# Altium PCB Pod_Islands_Panel.PcbDoc (part 7 of 10)
Units mm, origin at the board's own origin, x right, y up, seen from the top; angles counter-clockwise.
Board outline 95.7 x 83.7 mm, 6 copper layers (Top Layer, Inner1, Inner2, Inner3, Inner4, Bottom Layer), stack 0.82 mm thick; 1100 components, 940 nets, 4944 pads, 3680 vias.
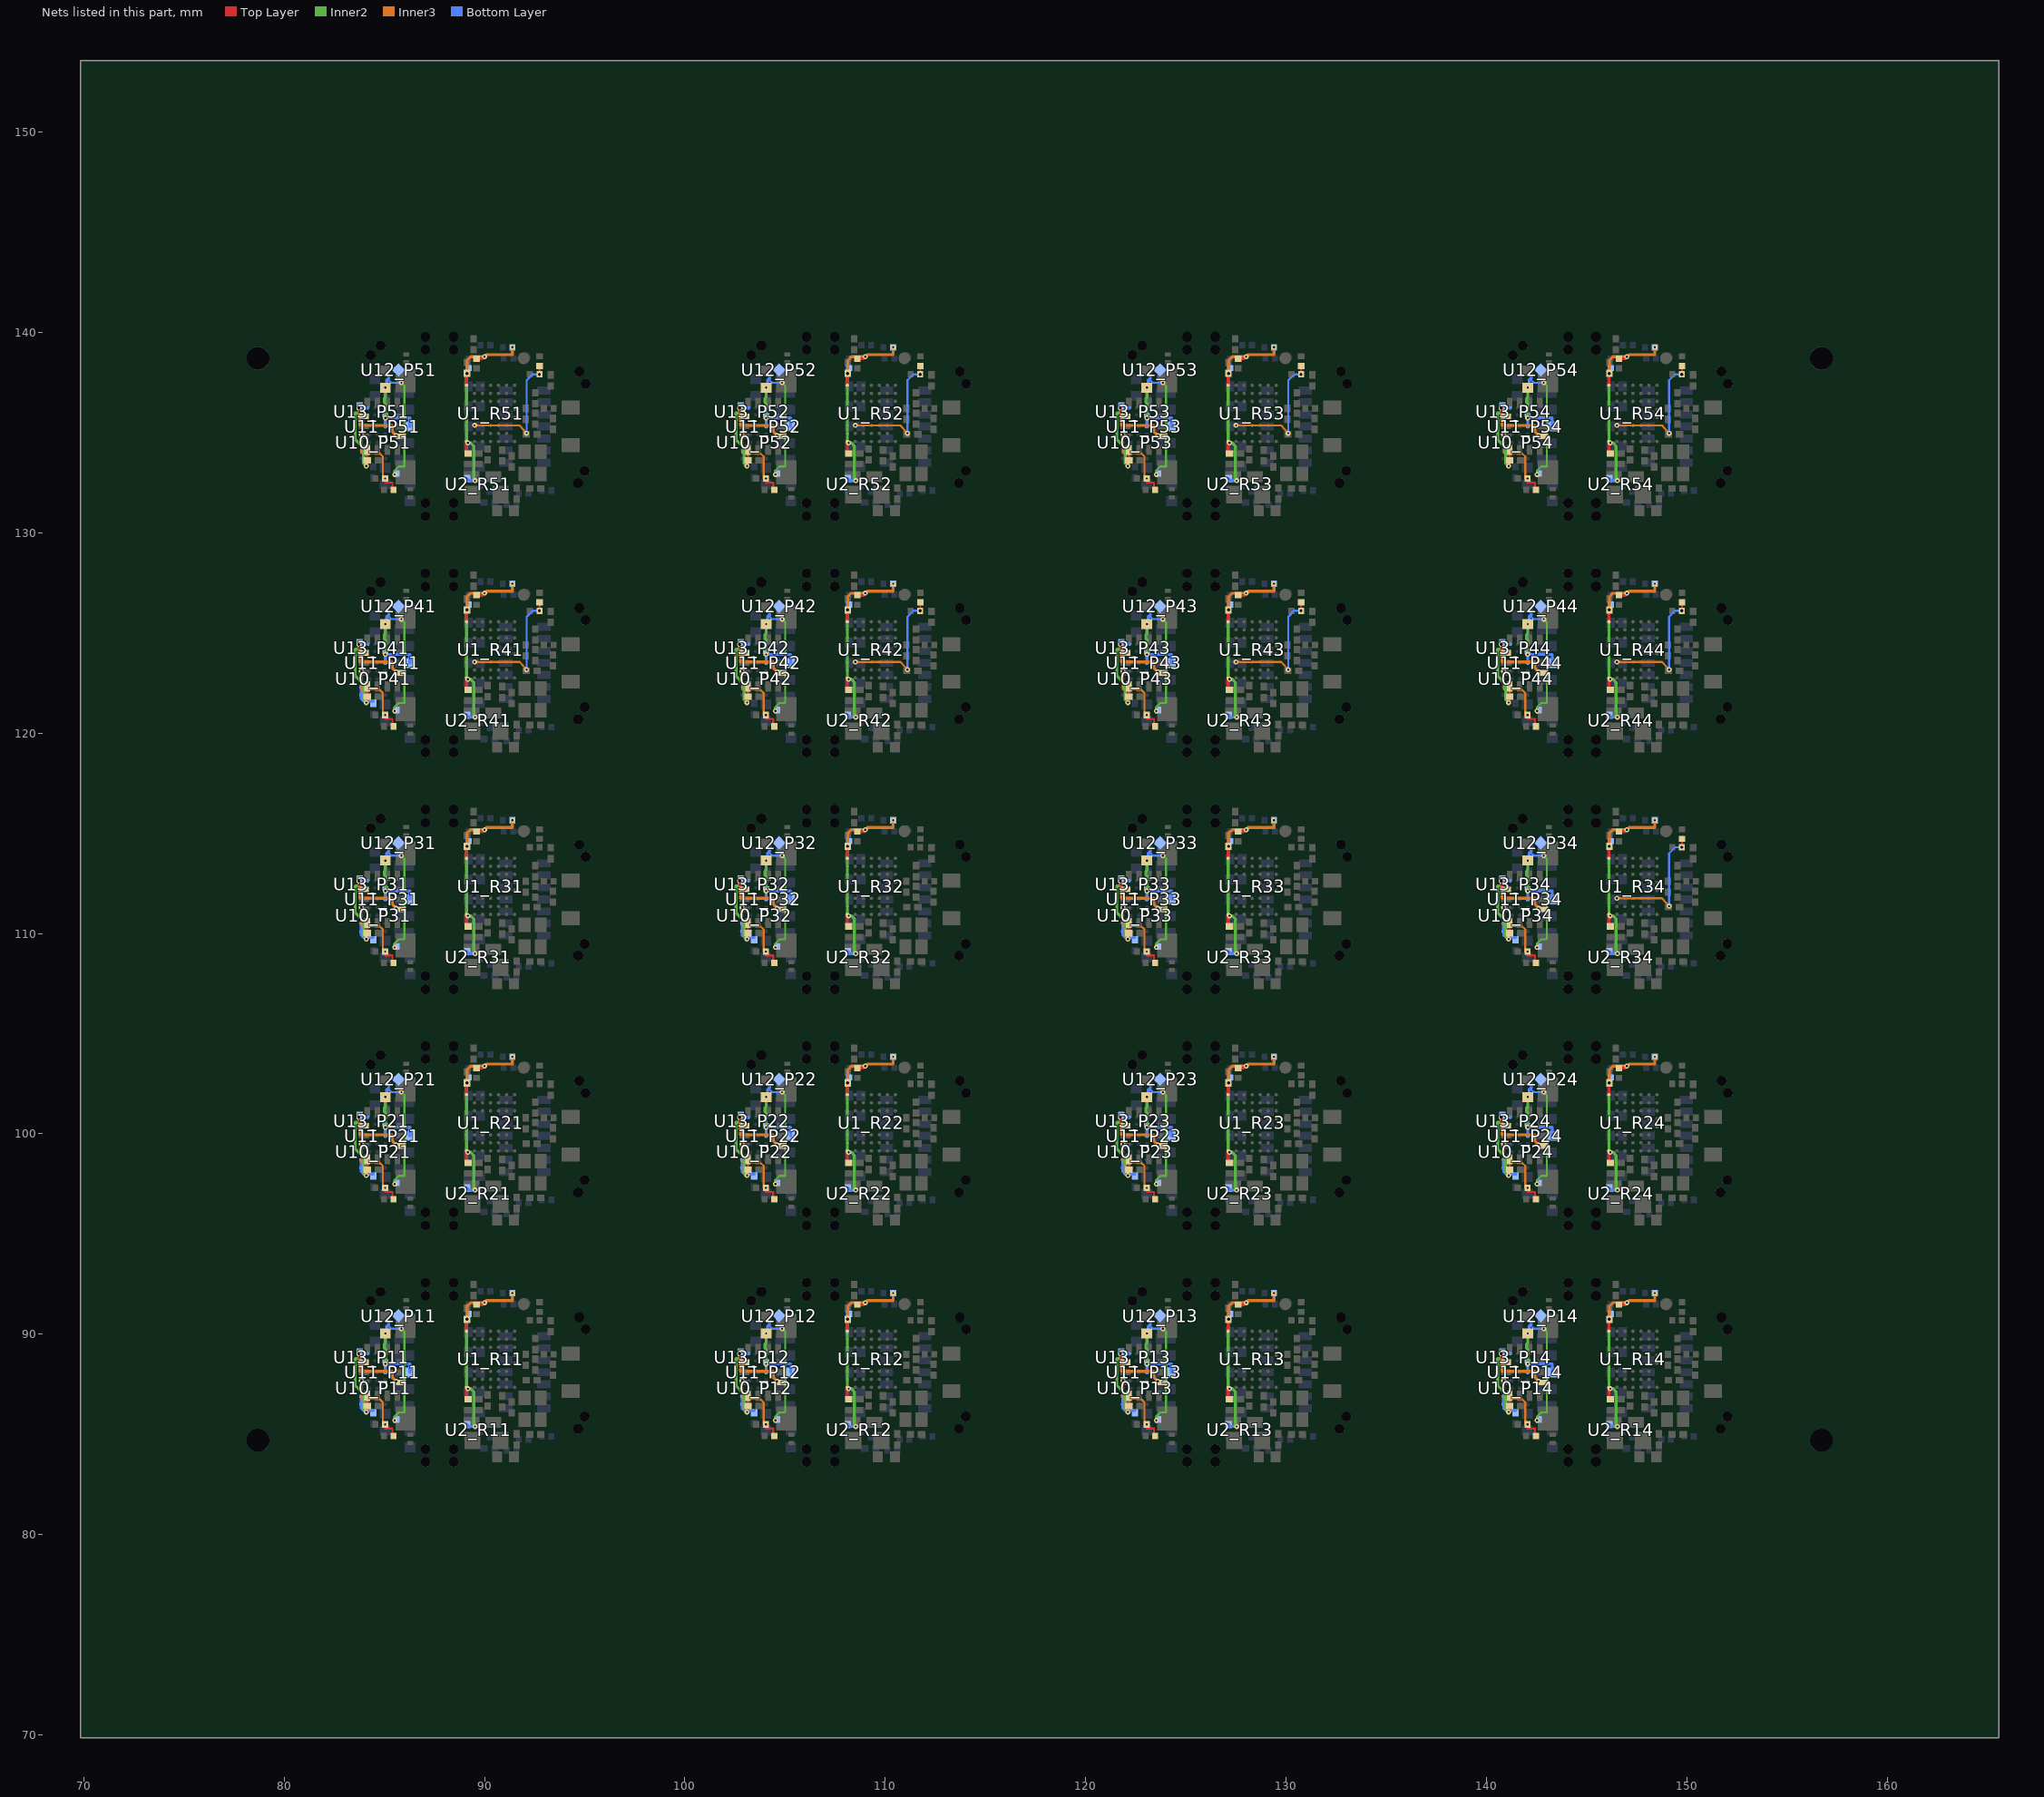
[diagram p11: the nets of this part, all layers, seen from the top]

## Via types
v1: diameter 0.249, hole 0.102, Top Layer to Inner1, 920 vias
v2: diameter 0.249, hole 0.102, Inner1 to Bottom Layer, 740 vias
v3: diameter 0.249, hole 0.102, Top Layer to Inner4, 580 vias
v4: diameter 0.249, hole 0.152, Top Layer to Bottom Layer, 540 vias
v5: diameter 0.249, hole 0.102, Inner4 to Bottom Layer, 520 vias
v6: diameter 0.3, hole 0.152, Inner1 to Inner4, 380 vias

## Nets (pads, with @x,y where several pads share a name; then routed paths per layer and width w, separated by ;. In a path a pad name is that pad's centre, name@x,y a point inside that pad or via, vN(x,y) a via of type N, cw(c..) or ccw(c..) an arc to the next point about the centre after c; other vN are vias at no path point) (continued)
TH4_SENSE_R34: R11_R34.2 TH4_R34.1 U1_R34.C6 | length 6.6
  Top Layer w0.1: v4(149.735,114.3) 149.751,114.31 TH4_R34.1@149.75,114.718
  Inner3 w0.1: v3(146.5,111.75) 148.75,111.75 v2(149.1,111.36)
  Bottom Layer w0.1: v2(149.1,111.36) 149.1,114 149.4,114.3 v4(149.735,114.3)
TH4_SENSE_R41: R11_R41.2 TH4_R41.1 U1_R41.C6 | length 6.6
  Top Layer w0.1: v4(92.735,126.1) 92.751,126.11 TH4_R41.1@92.751,126.519
  Inner3 w0.1: v3(89.5,123.55) 91.75,123.55 v2(92.1,123.16)
  Bottom Layer w0.1: v2(92.1,123.16) 92.1,125.8 92.4,126.1 v4(92.735,126.1)
TH4_SENSE_R42: R11_R42.2 TH4_R42.1 U1_R42.C6 | length 6.6
  Top Layer w0.1: v4(111.735,126.1) 111.751,126.11 TH4_R42.1@111.751,126.519
  Inner3 w0.1: v3(108.5,123.55) 110.75,123.55 v2(111.1,123.16)
  Bottom Layer w0.1: v2(111.1,123.16) 111.1,125.8 111.4,126.1 v4(111.735,126.1)
TH4_SENSE_R43: R11_R43.2 TH4_R43.1 U1_R43.C6 | length 6.6
  Top Layer w0.1: v4(130.735,126.1) 130.751,126.11 TH4_R43.1@130.751,126.519
  Inner3 w0.1: v3(127.5,123.55) 129.75,123.55 v2(130.1,123.16)
  Bottom Layer w0.1: v2(130.1,123.16) 130.1,125.8 130.4,126.1 v4(130.735,126.1)
TH4_SENSE_R44: R11_R44.2 TH4_R44.1 U1_R44.C6 | length 6.6
  Top Layer w0.1: v4(149.735,126.1) 149.751,126.11 TH4_R44.1@149.751,126.519
  Inner3 w0.1: v3(146.5,123.55) 148.75,123.55 v2(149.1,123.16)
  Bottom Layer w0.1: v2(149.1,123.16) 149.1,125.8 149.4,126.1 v4(149.735,126.1)
TH4_SENSE_R51: R11_R51.2 TH4_R51.1 U1_R51.C6 | length 6.6
  Top Layer w0.1: v4(92.735,137.9) 92.751,137.91 TH4_R51.1@92.75,138.318
  Inner3 w0.1: v3(89.5,135.35) 91.75,135.35 v2(92.1,134.96)
  Bottom Layer w0.1: v2(92.1,134.96) 92.1,137.6 92.4,137.9 v4(92.735,137.9)
TH4_SENSE_R52: R11_R52.2 TH4_R52.1 U1_R52.C6 | length 6.6
  Top Layer w0.1: v4(111.735,137.9) 111.751,137.91 TH4_R52.1@111.75,138.318
  Inner3 w0.1: v3(108.5,135.35) 110.75,135.35 v2(111.1,134.96)
  Bottom Layer w0.1: v2(111.1,134.96) 111.1,137.6 111.4,137.9 v4(111.735,137.9)
TH4_SENSE_R53: R11_R53.2 TH4_R53.1 U1_R53.C6 | length 6.6
  Top Layer w0.1: v4(130.735,137.9) 130.751,137.91 TH4_R53.1@130.751,138.319
  Inner3 w0.1: v3(127.5,135.35) 129.75,135.35 v2(130.1,134.96)
  Bottom Layer w0.1: v2(130.1,134.96) 130.1,137.6 130.4,137.9 v4(130.735,137.9)
TH4_SENSE_R54: R11_R54.2 TH4_R54.1 U1_R54.C6 | length 6.6
  Top Layer w0.1: v4(149.735,137.9) 149.751,137.91 TH4_R54.1@149.75,138.318
  Inner3 w0.1: v3(146.5,135.35) 148.75,135.35 v2(149.1,134.96)
  Bottom Layer w0.1: v2(149.1,134.96) 149.1,137.6 149.4,137.9 v4(149.735,137.9)
TS_P11: R50_P11.1 TH5_P11.1 U10_P11.B4 | length 4.2
  Top Layer w0.1: v3(85.041,85.501) 85.041,85.3 85.4,85.3 R50_P11.1@85.4,84.929
  Inner3 w0.1: v2(83.85,87.7) 83.85,86.775 84.75,86.775 84.925,86.6 84.925,85.5 v3(85.041,85.501)
TS_P12: R50_P12.1 TH5_P12.1 U10_P12.B4 | length 4.2
  Top Layer w0.1: v3(104.041,85.501) 104.041,85.3 104.4,85.3 R50_P12.1@104.4,84.929
  Inner3 w0.1: v2(102.85,87.7) 102.85,86.775 103.75,86.775 103.925,86.6 103.925,85.5 v3(104.041,85.501)
TS_P13: R50_P13.1 TH5_P13.1 U10_P13.B4 | length 4.2
  Top Layer w0.1: v3(123.041,85.501) 123.041,85.3 123.4,85.3 R50_P13.1@123.4,84.929
  Inner3 w0.1: v2(121.85,87.7) 121.85,86.775 122.75,86.775 122.925,86.6 122.925,85.5 v3(123.041,85.501)
TS_P14: R50_P14.1 TH5_P14.1 U10_P14.B4 | length 4.2
  Top Layer w0.1: v3(142.041,85.501) 142.041,85.3 142.4,85.3 R50_P14.1@142.4,84.929
  Inner3 w0.1: v2(140.85,87.7) 140.85,86.775 141.75,86.775 141.925,86.6 141.925,85.5 v3(142.041,85.501)
TS_P21: R50_P21.1 TH5_P21.1 U10_P21.B4 | length 4.2
  Top Layer w0.1: v3(85.041,97.301) 85.041,97.1 85.4,97.1 R50_P21.1@85.4,96.729
  Inner3 w0.1: v2(83.85,99.5) 83.85,98.575 84.75,98.575 84.925,98.4 84.925,97.3 v3(85.041,97.301)
TS_P22: R50_P22.1 TH5_P22.1 U10_P22.B4 | length 4.2
  Top Layer w0.1: v3(104.041,97.301) 104.041,97.1 104.4,97.1 R50_P22.1@104.4,96.729
  Inner3 w0.1: v2(102.85,99.5) 102.85,98.575 103.75,98.575 103.925,98.4 103.925,97.3 v3(104.041,97.301)
TS_P23: R50_P23.1 TH5_P23.1 U10_P23.B4 | length 4.2
  Top Layer w0.1: v3(123.041,97.301) 123.041,97.1 123.4,97.1 R50_P23.1@123.4,96.729
  Inner3 w0.1: v2(121.85,99.5) 121.85,98.575 122.75,98.575 122.925,98.4 122.925,97.3 v3(123.041,97.301)
TS_P24: R50_P24.1 TH5_P24.1 U10_P24.B4 | length 4.2
  Top Layer w0.1: v3(142.041,97.301) 142.041,97.1 142.4,97.1 R50_P24.1@142.4,96.729
  Inner3 w0.1: v2(140.85,99.5) 140.85,98.575 141.75,98.575 141.925,98.4 141.925,97.3 v3(142.041,97.301)
TS_P31: R50_P31.1 TH5_P31.1 U10_P31.B4 | length 4.2
  Top Layer w0.1: v3(85.041,109.101) 85.041,108.9 85.4,108.9 R50_P31.1@85.4,108.529
  Inner3 w0.1: v2(83.85,111.3) 83.85,110.375 84.75,110.375 84.925,110.2 84.925,109.1 v3(85.041,109.101)
TS_P32: R50_P32.1 TH5_P32.1 U10_P32.B4 | length 4.2
  Top Layer w0.1: v3(104.041,109.101) 104.041,108.9 104.4,108.9 R50_P32.1@104.4,108.529
  Inner3 w0.1: v2(102.85,111.3) 102.85,110.375 103.75,110.375 103.925,110.2 103.925,109.1 v3(104.041,109.101)
TS_P33: R50_P33.1 TH5_P33.1 U10_P33.B4 | length 4.2
  Top Layer w0.1: v3(123.041,109.101) 123.041,108.9 123.4,108.9 R50_P33.1@123.4,108.529
  Inner3 w0.1: v2(121.85,111.3) 121.85,110.375 122.75,110.375 122.925,110.2 122.925,109.1 v3(123.041,109.101)
TS_P34: R50_P34.1 TH5_P34.1 U10_P34.B4 | length 4.2
  Top Layer w0.1: v3(142.041,109.101) 142.041,108.9 142.4,108.9 R50_P34.1@142.4,108.529
  Inner3 w0.1: v2(140.85,111.3) 140.85,110.375 141.75,110.375 141.925,110.2 141.925,109.1 v3(142.041,109.101)
TS_P41: R50_P41.1 TH5_P41.1 U10_P41.B4 | length 4.2
  Top Layer w0.1: v3(85.041,120.901) 85.041,120.7 85.4,120.7 R50_P41.1@85.4,120.329
  Inner3 w0.1: v2(83.85,123.1) 83.85,122.175 84.75,122.175 84.925,122 84.925,120.9 v3(85.041,120.901)
TS_P42: R50_P42.1 TH5_P42.1 U10_P42.B4 | length 4.2
  Top Layer w0.1: v3(104.041,120.901) 104.041,120.7 104.4,120.7 R50_P42.1@104.4,120.329
  Inner3 w0.1: v2(102.85,123.1) 102.85,122.175 103.75,122.175 103.925,122 103.925,120.9 v3(104.041,120.901)
TS_P43: R50_P43.1 TH5_P43.1 U10_P43.B4 | length 4.2
  Top Layer w0.1: v3(123.041,120.901) 123.041,120.7 123.4,120.7 R50_P43.1@123.4,120.329
  Inner3 w0.1: v2(121.85,123.1) 121.85,122.175 122.75,122.175 122.925,122 122.925,120.9 v3(123.041,120.901)
TS_P44: R50_P44.1 TH5_P44.1 U10_P44.B4 | length 4.2
  Top Layer w0.1: v3(142.041,120.901) 142.041,120.7 142.4,120.7 R50_P44.1@142.4,120.329
  Inner3 w0.1: v2(140.85,123.1) 140.85,122.175 141.75,122.175 141.925,122 141.925,120.9 v3(142.041,120.901)
TS_P51: R50_P51.1 TH5_P51.1 U10_P51.B4 | length 4.2
  Top Layer w0.1: v3(85.041,132.701) 85.041,132.5 85.4,132.5 R50_P51.1@85.4,132.129
  Inner3 w0.1: v2(83.85,134.9) 83.85,133.975 84.75,133.975 84.925,133.8 84.925,132.7 v3(85.041,132.701)
TS_P52: R50_P52.1 TH5_P52.1 U10_P52.B4 | length 4.2
  Top Layer w0.1: v3(104.041,132.701) 104.041,132.5 104.4,132.5 R50_P52.1@104.4,132.129
  Inner3 w0.1: v2(102.85,134.9) 102.85,133.975 103.75,133.975 103.925,133.8 103.925,132.7 v3(104.041,132.701)
TS_P53: R50_P53.1 TH5_P53.1 U10_P53.B4 | length 4.2
  Top Layer w0.1: v3(123.041,132.701) 123.041,132.5 123.4,132.5 R50_P53.1@123.4,132.129
  Inner3 w0.1: v2(121.85,134.9) 121.85,133.975 122.75,133.975 122.925,133.8 122.925,132.7 v3(123.041,132.701)
TS_P54: R50_P54.1 TH5_P54.1 U10_P54.B4 | length 4.2
  Top Layer w0.1: v3(142.041,132.701) 142.041,132.5 142.4,132.5 R50_P54.1@142.4,132.129
  Inner3 w0.1: v2(140.85,134.9) 140.85,133.975 141.75,133.975 141.925,133.8 141.925,132.7 v3(142.041,132.701)
U12_EP_P11: U12_P11.5
U12_EP_P12: U12_P12.5
U12_EP_P13: U12_P13.5
U12_EP_P14: U12_P14.5
U12_EP_P21: U12_P21.5
U12_EP_P22: U12_P22.5
U12_EP_P23: U12_P23.5
U12_EP_P24: U12_P24.5
U12_EP_P31: U12_P31.5
U12_EP_P32: U12_P32.5
U12_EP_P33: U12_P33.5
U12_EP_P34: U12_P34.5
U12_EP_P41: U12_P41.5
U12_EP_P42: U12_P42.5
U12_EP_P43: U12_P43.5
U12_EP_P44: U12_P44.5
U12_EP_P51: U12_P51.5
U12_EP_P52: U12_P52.5
U12_EP_P53: U12_P53.5
U12_EP_P54: U12_P54.5
U12_VDD_P11: C55_P11.1 R51_P11.2 U12_P11.1 | length 6.5
  Inner2 w0.1: v2(85.52,85.7) 85.52,85.9 85.72,86.1 86,86.1 86,90.13 v2(85.85,90.28)
  Bottom Layer w0.1: 85.224,90.504 85.224,90.406 85.35,90.28 v2(85.85,90.28) ; v2(85.52,85.7) 85.558,85.7 R51_P11.2@85.608,85.75
  Bottom Layer w0.15: C55_P11.1@85.12,90.039 85.12,90.4 85.224,90.504 U12_P11.1@85.224,90.596
U12_VDD_P12: C55_P12.1 R51_P12.2 U12_P12.1 | length 6.5
  Inner2 w0.1: v2(104.52,85.7) 104.52,85.9 104.72,86.1 105,86.1 105,90.13 v2(104.85,90.28)
  Bottom Layer w0.1: 104.224,90.504 104.224,90.406 104.35,90.28 v2(104.85,90.28) ; v2(104.52,85.7) 104.558,85.7 R51_P12.2@104.608,85.75
  Bottom Layer w0.15: C55_P12.1@104.12,90.039 104.12,90.4 104.224,90.504 U12_P12.1@104.224,90.596
U12_VDD_P13: C55_P13.1 R51_P13.2 U12_P13.1 | length 6.5
  Inner2 w0.1: v2(123.52,85.7) 123.52,85.9 123.72,86.1 124,86.1 124,90.13 v2(123.85,90.28)
  Bottom Layer w0.1: 123.224,90.504 123.224,90.406 123.35,90.28 v2(123.85,90.28) ; v2(123.52,85.7) 123.558,85.7 R51_P13.2@123.607,85.75
  Bottom Layer w0.15: C55_P13.1@123.12,90.039 123.12,90.4 123.224,90.504 U12_P13.1@123.224,90.596
U12_VDD_P14: C55_P14.1 R51_P14.2 U12_P14.1 | length 6.5
  Inner2 w0.1: v2(142.52,85.7) 142.52,85.9 142.72,86.1 143,86.1 143,90.13 v2(142.85,90.28)
  Bottom Layer w0.1: 142.224,90.504 142.224,90.406 142.35,90.28 v2(142.85,90.28) ; v2(142.52,85.7) 142.558,85.7 R51_P14.2@142.608,85.75
  Bottom Layer w0.15: C55_P14.1@142.12,90.039 142.12,90.4 142.224,90.504 U12_P14.1@142.224,90.596
U12_VDD_P21: C55_P21.1 R51_P21.2 U12_P21.1 | length 6.5
  Inner2 w0.1: v2(85.52,97.5) 85.52,97.7 85.72,97.9 86,97.9 86,101.93 v2(85.85,102.08)
  Bottom Layer w0.1: 85.224,102.304 85.224,102.206 85.35,102.08 v2(85.85,102.08) ; v2(85.52,97.5) 85.558,97.5 R51_P21.2@85.607,97.55
  Bottom Layer w0.15: C55_P21.1@85.12,101.839 85.12,102.2 85.224,102.304 U12_P21.1@85.224,102.396
U12_VDD_P22: C55_P22.1 R51_P22.2 U12_P22.1 | length 6.5
  Inner2 w0.1: v2(104.52,97.5) 104.52,97.7 104.72,97.9 105,97.9 105,101.93 v2(104.85,102.08)
  Bottom Layer w0.1: 104.224,102.304 104.224,102.206 104.35,102.08 v2(104.85,102.08) ; v2(104.52,97.5) 104.558,97.5 R51_P22.2@104.607,97.55
  Bottom Layer w0.15: C55_P22.1@104.12,101.839 104.12,102.2 104.224,102.304 U12_P22.1@104.224,102.396
U12_VDD_P23: C55_P23.1 R51_P23.2 U12_P23.1 | length 6.5
  Inner2 w0.1: v2(123.52,97.5) 123.52,97.7 123.72,97.9 124,97.9 124,101.93 v2(123.85,102.08)
  Bottom Layer w0.1: 123.224,102.304 123.224,102.206 123.35,102.08 v2(123.85,102.08) ; v2(123.52,97.5) 123.558,97.5 R51_P23.2@123.607,97.55
  Bottom Layer w0.15: C55_P23.1@123.12,101.839 123.12,102.2 123.224,102.304 U12_P23.1@123.224,102.396
U12_VDD_P24: C55_P24.1 R51_P24.2 U12_P24.1 | length 6.5
  Inner2 w0.1: v2(142.52,97.5) 142.52,97.7 142.72,97.9 143,97.9 143,101.93 v2(142.85,102.08)
  Bottom Layer w0.1: 142.224,102.304 142.224,102.206 142.35,102.08 v2(142.85,102.08) ; v2(142.52,97.5) 142.558,97.5 R51_P24.2@142.607,97.55
  Bottom Layer w0.15: C55_P24.1@142.12,101.839 142.12,102.2 142.224,102.304 U12_P24.1@142.224,102.396
U12_VDD_P31: C55_P31.1 R51_P31.2 U12_P31.1 | length 6.5
  Inner2 w0.1: v2(85.52,109.3) 85.52,109.5 85.72,109.7 86,109.7 86,113.73 v2(85.85,113.88)
  Bottom Layer w0.1: 85.224,114.104 85.224,114.006 85.35,113.88 v2(85.85,113.88) ; v2(85.52,109.3) 85.558,109.3 R51_P31.2@85.608,109.35
  Bottom Layer w0.15: C55_P31.1@85.12,113.639 85.12,114 85.224,114.104 U12_P31.1@85.224,114.196
U12_VDD_P32: C55_P32.1 R51_P32.2 U12_P32.1 | length 6.5
  Inner2 w0.1: v2(104.52,109.3) 104.52,109.5 104.72,109.7 105,109.7 105,113.73 v2(104.85,113.88)
  Bottom Layer w0.1: 104.224,114.104 104.224,114.006 104.35,113.88 v2(104.85,113.88) ; v2(104.52,109.3) 104.558,109.3 R51_P32.2@104.608,109.35
  Bottom Layer w0.15: C55_P32.1@104.12,113.639 104.12,114 104.224,114.104 U12_P32.1@104.224,114.196
U12_VDD_P33: C55_P33.1 R51_P33.2 U12_P33.1 | length 6.5
  Inner2 w0.1: v2(123.52,109.3) 123.52,109.5 123.72,109.7 124,109.7 124,113.73 v2(123.85,113.88)
  Bottom Layer w0.1: 123.224,114.104 123.224,114.006 123.35,113.88 v2(123.85,113.88) ; v2(123.52,109.3) 123.558,109.3 R51_P33.2@123.607,109.35
  Bottom Layer w0.15: C55_P33.1@123.12,113.639 123.12,114 123.224,114.104 U12_P33.1@123.224,114.196
U12_VDD_P34: C55_P34.1 R51_P34.2 U12_P34.1 | length 6.5
  Inner2 w0.1: v2(142.52,109.3) 142.52,109.5 142.72,109.7 143,109.7 143,113.73 v2(142.85,113.88)
  Bottom Layer w0.1: 142.224,114.104 142.224,114.006 142.35,113.88 v2(142.85,113.88) ; v2(142.52,109.3) 142.558,109.3 R51_P34.2@142.608,109.35
  Bottom Layer w0.15: C55_P34.1@142.12,113.639 142.12,114 142.224,114.104 U12_P34.1@142.224,114.196
U12_VDD_P41: C55_P41.1 R51_P41.2 U12_P41.1 | length 6.5
  Inner2 w0.1: v2(85.52,121.1) 85.52,121.3 85.72,121.5 86,121.5 86,125.53 v2(85.85,125.68)
  Bottom Layer w0.1: 85.224,125.904 85.224,125.806 85.35,125.68 v2(85.85,125.68) ; v2(85.52,121.1) 85.558,121.1 R51_P41.2@85.608,121.15
  Bottom Layer w0.15: C55_P41.1@85.12,125.439 85.12,125.8 85.224,125.904 U12_P41.1@85.224,125.996
U12_VDD_P42: C55_P42.1 R51_P42.2 U12_P42.1 | length 6.5
  Inner2 w0.1: v2(104.52,121.1) 104.52,121.3 104.72,121.5 105,121.5 105,125.53 v2(104.85,125.68)
  Bottom Layer w0.1: 104.224,125.904 104.224,125.806 104.35,125.68 v2(104.85,125.68) ; v2(104.52,121.1) 104.558,121.1 R51_P42.2@104.608,121.15
  Bottom Layer w0.15: C55_P42.1@104.12,125.439 104.12,125.8 104.224,125.904 U12_P42.1@104.224,125.996
U12_VDD_P43: C55_P43.1 R51_P43.2 U12_P43.1 | length 6.5
  Inner2 w0.1: v2(123.52,121.1) 123.52,121.3 123.72,121.5 124,121.5 124,125.53 v2(123.85,125.68)
  Bottom Layer w0.1: 123.224,125.904 123.224,125.806 123.35,125.68 v2(123.85,125.68) ; v2(123.52,121.1) 123.558,121.1 R51_P43.2@123.607,121.15
  Bottom Layer w0.15: C55_P43.1@123.12,125.439 123.12,125.8 123.224,125.904 U12_P43.1@123.224,125.996
U12_VDD_P44: C55_P44.1 R51_P44.2 U12_P44.1 | length 6.5
  Inner2 w0.1: v2(142.52,121.1) 142.52,121.3 142.72,121.5 143,121.5 143,125.53 v2(142.85,125.68)
  Bottom Layer w0.1: 142.224,125.904 142.224,125.806 142.35,125.68 v2(142.85,125.68) ; v2(142.52,121.1) 142.558,121.1 R51_P44.2@142.608,121.15
  Bottom Layer w0.15: C55_P44.1@142.12,125.439 142.12,125.8 142.224,125.904 U12_P44.1@142.224,125.996
U12_VDD_P51: C55_P51.1 R51_P51.2 U12_P51.1 | length 6.5
  Inner2 w0.1: v2(85.52,132.9) 85.52,133.1 85.72,133.3 86,133.3 86,137.33 v2(85.85,137.48)
  Bottom Layer w0.1: 85.224,137.704 85.224,137.606 85.35,137.48 v2(85.85,137.48) ; v2(85.52,132.9) 85.558,132.9 R51_P51.2@85.607,132.95
  Bottom Layer w0.15: C55_P51.1@85.12,137.239 85.12,137.6 85.224,137.704 U12_P51.1@85.224,137.796
U12_VDD_P52: C55_P52.1 R51_P52.2 U12_P52.1 | length 6.5
  Inner2 w0.1: v2(104.52,132.9) 104.52,133.1 104.72,133.3 105,133.3 105,137.33 v2(104.85,137.48)
  Bottom Layer w0.1: 104.224,137.704 104.224,137.606 104.35,137.48 v2(104.85,137.48) ; v2(104.52,132.9) 104.558,132.9 R51_P52.2@104.607,132.95
  Bottom Layer w0.15: C55_P52.1@104.12,137.239 104.12,137.6 104.224,137.704 U12_P52.1@104.224,137.796
U12_VDD_P53: C55_P53.1 R51_P53.2 U12_P53.1 | length 6.5
  Inner2 w0.1: v2(123.52,132.9) 123.52,133.1 123.72,133.3 124,133.3 124,137.33 v2(123.85,137.48)
  Bottom Layer w0.1: 123.224,137.704 123.224,137.606 123.35,137.48 v2(123.85,137.48) ; v2(123.52,132.9) 123.558,132.9 R51_P53.2@123.607,132.95
  Bottom Layer w0.15: C55_P53.1@123.12,137.239 123.12,137.6 123.224,137.704 U12_P53.1@123.224,137.796
U12_VDD_P54: C55_P54.1 R51_P54.2 U12_P54.1 | length 6.5
  Inner2 w0.1: v2(142.52,132.9) 142.52,133.1 142.72,133.3 143,133.3 143,137.33 v2(142.85,137.48)
  Bottom Layer w0.1: 142.224,137.704 142.224,137.606 142.35,137.48 v2(142.85,137.48) ; v2(142.52,132.9) 142.558,132.9 R51_P54.2@142.607,132.95
  Bottom Layer w0.15: C55_P54.1@142.12,137.239 142.12,137.6 142.224,137.704 U12_P54.1@142.224,137.796
VDD_1V8_R11: C5_R11.1 C8_R11.1 C21_R11.1 R1_R11.1 R2_R11.1 R3_R11.1 U1_R11.A7 U1_R11.H7 U2_R11.A2 | length 11.2
  Top Layer w0.15: U1_R11.H7@89.1,90.15 89.094,90.718 v4(89.122,90.746) ; v3(89.17,87.281) U1_R11.A7@89.1,87.35 89.101,86.824 C8_R11.1@89.175,86.75 ; R3_R11.1@89.599,91.481 89.904,91.48 v3(90,91.576)
  Inner2 w0.15: v4(89.122,90.746) 89.101,90.718 89.101,87.35 v3(89.17,87.281) 89.31,87.281 89.46,87.131 89.46,85.459 v2(89.525,85.394)
  Inner3 w0.15: v4(89.122,90.746) 89.129,91.405 89.3,91.576 v3(90,91.576) 90.104,91.68 91.392,91.68 v2(91.392,92.049)
  Bottom Layer w0.15: C21_R11.1@89.129,85.496 89.231,85.394 v2(89.525,85.394)
VDD_1V8_R12: C5_R12.1 C8_R12.1 C21_R12.1 R1_R12.1 R2_R12.1 R3_R12.1 U1_R12.A7 U1_R12.H7 U2_R12.A2 | length 11.2
  Top Layer w0.15: U1_R12.H7@108.1,90.15 108.094,90.718 v4(108.122,90.746) ; v3(108.17,87.281) U1_R12.A7@108.1,87.35 108.101,86.824 C8_R12.1@108.175,86.75 ; R3_R12.1@108.599,91.481 108.904,91.48 v3(109,91.576)
  Inner2 w0.15: v4(108.122,90.746) 108.101,90.718 108.101,87.35 v3(108.17,87.281) 108.31,87.281 108.46,87.131 108.46,85.459 v2(108.525,85.394)
  Inner3 w0.15: v4(108.122,90.746) 108.129,91.405 108.3,91.576 v3(109,91.576) 109.104,91.68 110.392,91.68 v2(110.392,92.049)
  Bottom Layer w0.15: C21_R12.1@108.129,85.496 108.231,85.394 v2(108.525,85.394)
VDD_1V8_R13: C5_R13.1 C8_R13.1 C21_R13.1 R1_R13.1 R2_R13.1 R3_R13.1 U1_R13.A7 U1_R13.H7 U2_R13.A2 | length 11.2
  Top Layer w0.15: U1_R13.H7@127.101,90.149 127.094,90.718 v4(127.122,90.746) ; v3(127.17,87.281) 127.101,87.35 127.101,86.824 C8_R13.1@127.175,86.75 ; R3_R13.1@127.599,91.481 127.904,91.48 v3(128,91.576)
  Inner2 w0.15: v4(127.122,90.746) 127.101,90.718 127.101,87.35 v3(127.17,87.281) 127.31,87.281 127.46,87.131 127.46,85.459 v2(127.525,85.394)
  Inner3 w0.15: v4(127.122,90.746) 127.129,91.405 127.3,91.576 v3(128,91.576) 128.104,91.68 129.392,91.68 v2(129.392,92.049)
  Bottom Layer w0.15: C21_R13.1@127.129,85.496 127.231,85.394 v2(127.525,85.394)
VDD_1V8_R14: C5_R14.1 C8_R14.1 C21_R14.1 R1_R14.1 R2_R14.1 R3_R14.1 U1_R14.A7 U1_R14.H7 U2_R14.A2 | length 11.2
  Top Layer w0.15: U1_R14.H7@146.1,90.15 146.094,90.718 v4(146.122,90.746) ; v3(146.17,87.281) U1_R14.A7@146.1,87.35 146.101,86.824 C8_R14.1@146.175,86.75 ; R3_R14.1@146.599,91.481 146.904,91.48 v3(147,91.576)
  Inner2 w0.15: v4(146.122,90.746) 146.101,90.718 146.101,87.35 v3(146.17,87.281) 146.31,87.281 146.46,87.131 146.46,85.459 v2(146.525,85.394)
  Inner3 w0.15: v4(146.122,90.746) 146.129,91.405 146.3,91.576 v3(147,91.576) 147.104,91.68 148.392,91.68 v2(148.392,92.049)
  Bottom Layer w0.15: C21_R14.1@146.129,85.496 146.231,85.394 v2(146.525,85.394)
VDD_1V8_R21: C5_R21.1 C8_R21.1 C21_R21.1 R1_R21.1 R2_R21.1 R3_R21.1 U1_R21.A7 U1_R21.H7 U2_R21.A2 | length 11.2
  Top Layer w0.15: U1_R21.H7@89.101,101.949 89.094,102.518 v4(89.122,102.546) ; v3(89.17,99.081) U1_R21.A7@89.1,99.15 89.101,98.624 C8_R21.1@89.175,98.55 ; R3_R21.1@89.599,103.28 89.904,103.28 v3(90,103.376)
  Inner2 w0.15: v4(89.122,102.546) 89.101,102.518 89.101,99.15 v3(89.17,99.081) 89.31,99.081 89.46,98.931 89.46,97.259 v2(89.525,97.194)
  Inner3 w0.15: v4(89.122,102.546) 89.129,103.205 89.3,103.376 v3(90,103.376) 90.104,103.48 91.392,103.48 v2(91.392,103.849)
  Bottom Layer w0.15: C21_R21.1@89.129,97.296 89.231,97.194 v2(89.525,97.194)
VDD_1V8_R22: C5_R22.1 C8_R22.1 C21_R22.1 R1_R22.1 R2_R22.1 R3_R22.1 U1_R22.A7 U1_R22.H7 U2_R22.A2 | length 11.2
  Top Layer w0.15: U1_R22.H7@108.101,101.949 108.094,102.518 v4(108.122,102.546) ; v3(108.17,99.081) U1_R22.A7@108.1,99.15 108.101,98.624 C8_R22.1@108.175,98.55 ; R3_R22.1@108.599,103.28 108.904,103.28 v3(109,103.376)
  Inner2 w0.15: v4(108.122,102.546) 108.101,102.518 108.101,99.15 v3(108.17,99.081) 108.31,99.081 108.46,98.931 108.46,97.259 v2(108.525,97.194)
  Inner3 w0.15: v4(108.122,102.546) 108.129,103.205 108.3,103.376 v3(109,103.376) 109.104,103.48 110.392,103.48 v2(110.392,103.849)
  Bottom Layer w0.15: C21_R22.1@108.13,97.294 108.231,97.194 v2(108.525,97.194)
VDD_1V8_R23: C5_R23.1 C8_R23.1 C21_R23.1 R1_R23.1 R2_R23.1 R3_R23.1 U1_R23.A7 U1_R23.H7 U2_R23.A2 | length 11.2
  Top Layer w0.15: U1_R23.H7@127.101,101.949 127.094,102.518 v4(127.122,102.546) ; v3(127.17,99.081) 127.101,99.15 127.101,98.624 C8_R23.1@127.175,98.55 ; R3_R23.1@127.599,103.28 127.904,103.28 v3(128,103.376)
  Inner2 w0.15: v4(127.122,102.546) 127.101,102.518 127.101,99.15 v3(127.17,99.081) 127.31,99.081 127.46,98.931 127.46,97.259 v2(127.525,97.194)
  Inner3 w0.15: v4(127.122,102.546) 127.129,103.205 127.3,103.376 v3(128,103.376) 128.104,103.48 129.392,103.48 v2(129.392,103.849)
  Bottom Layer w0.15: C21_R23.1@127.13,97.294 127.231,97.194 v2(127.525,97.194)
VDD_1V8_R24: C5_R24.1 C8_R24.1 C21_R24.1 R1_R24.1 R2_R24.1 R3_R24.1 U1_R24.A7 U1_R24.H7 U2_R24.A2 | length 11.2
  Top Layer w0.15: U1_R24.H7@146.101,101.949 146.094,102.518 v4(146.122,102.546) ; v3(146.17,99.081) U1_R24.A7@146.1,99.15 146.101,98.624 C8_R24.1@146.175,98.55 ; R3_R24.1@146.599,103.28 146.904,103.28 v3(147,103.376)
  Inner2 w0.15: v4(146.122,102.546) 146.101,102.518 146.101,99.15 v3(146.17,99.081) 146.31,99.081 146.46,98.931 146.46,97.259 v2(146.525,97.194)
  Inner3 w0.15: v4(146.122,102.546) 146.129,103.205 146.3,103.376 v3(147,103.376) 147.104,103.48 148.392,103.48 v2(148.392,103.849)
  Bottom Layer w0.15: C21_R24.1@146.129,97.296 146.231,97.194 v2(146.525,97.194)
VDD_1V8_R31: C5_R31.1 C8_R31.1 C21_R31.1 R1_R31.1 R2_R31.1 R3_R31.1 U1_R31.A7 U1_R31.H7 U2_R31.A2 | length 11.2
  Top Layer w0.15: U1_R31.H7@89.1,113.75 89.094,114.318 v4(89.122,114.346) ; v3(89.17,110.881) U1_R31.A7@89.1,110.95 89.101,110.424 C8_R31.1@89.175,110.35 ; R3_R31.1@89.599,115.08 89.904,115.08 v3(90,115.176)
  Inner2 w0.15: v4(89.122,114.346) 89.101,114.318 89.101,110.95 v3(89.17,110.881) 89.31,110.881 89.46,110.731 89.46,109.059 v2(89.525,108.994)
  Inner3 w0.15: v4(89.122,114.346) 89.129,115.005 89.3,115.176 v3(90,115.176) 90.104,115.28 91.392,115.28 v2(91.392,115.649)
  Bottom Layer w0.15: C21_R31.1@89.129,109.096 89.231,108.994 v2(89.525,108.994)
VDD_1V8_R32: C5_R32.1 C8_R32.1 C21_R32.1 R1_R32.1 R2_R32.1 R3_R32.1 U1_R32.A7 U1_R32.H7 U2_R32.A2 | length 11.2
  Top Layer w0.15: U1_R32.H7@108.1,113.75 108.094,114.318 v4(108.122,114.346) ; v3(108.17,110.881) U1_R32.A7@108.1,110.95 108.101,110.424 C8_R32.1@108.175,110.35 ; R3_R32.1@108.599,115.08 108.904,115.08 v3(109,115.176)
  Inner2 w0.15: v4(108.122,114.346) 108.101,114.318 108.101,110.95 v3(108.17,110.881) 108.31,110.881 108.46,110.731 108.46,109.059 v2(108.525,108.994)
  Inner3 w0.15: v4(108.122,114.346) 108.129,115.005 108.3,115.176 v3(109,115.176) 109.104,115.28 110.392,115.28 v2(110.392,115.649)
  Bottom Layer w0.15: C21_R32.1@108.13,109.094 108.231,108.994 v2(108.525,108.994)
VDD_1V8_R33: C5_R33.1 C8_R33.1 C21_R33.1 R1_R33.1 R2_R33.1 R3_R33.1 U1_R33.A7 U1_R33.H7 U2_R33.A2 | length 11.2
  Top Layer w0.15: U1_R33.H7@127.101,113.749 127.094,114.318 v4(127.122,114.346) ; v3(127.17,110.881) 127.101,110.95 127.101,110.424 C8_R33.1@127.175,110.35 ; R3_R33.1@127.599,115.08 127.904,115.08 v3(128,115.176)
  Inner2 w0.15: v4(127.122,114.346) 127.101,114.318 127.101,110.95 v3(127.17,110.881) 127.31,110.881 127.46,110.731 127.46,109.059 v2(127.525,108.994)
  Inner3 w0.15: v4(127.122,114.346) 127.129,115.005 127.3,115.176 v3(128,115.176) 128.104,115.28 129.392,115.28 v2(129.392,115.649)
  Bottom Layer w0.15: C21_R33.1@127.13,109.094 127.231,108.994 v2(127.525,108.994)
VDD_1V8_R34: C5_R34.1 C8_R34.1 C21_R34.1 R1_R34.1 R2_R34.1 R3_R34.1 U1_R34.A7 U1_R34.H7 U2_R34.A2 | length 11.2
  Top Layer w0.15: U1_R34.H7@146.1,113.75 146.094,114.318 v4(146.122,114.346) ; v3(146.17,110.881) U1_R34.A7@146.1,110.95 146.101,110.424 C8_R34.1@146.175,110.35 ; R3_R34.1@146.599,115.08 146.904,115.08 v3(147,115.176)
  Inner2 w0.15: v4(146.122,114.346) 146.101,114.318 146.101,110.95 v3(146.17,110.881) 146.31,110.881 146.46,110.731 146.46,109.059 v2(146.525,108.994)
  Inner3 w0.15: v4(146.122,114.346) 146.129,115.005 146.3,115.176 v3(147,115.176) 147.104,115.28 148.392,115.28 v2(148.392,115.649)
  Bottom Layer w0.15: C21_R34.1@146.129,109.096 146.231,108.994 v2(146.525,108.994)
VDD_1V8_R41: C5_R41.1 C8_R41.1 C21_R41.1 R1_R41.1 R2_R41.1 R3_R41.1 U1_R41.A7 U1_R41.H7 U2_R41.A2 | length 11.2
  Top Layer w0.15: U1_R41.H7@89.1,125.55 89.094,126.118 v4(89.122,126.146) ; v3(89.17,122.681) U1_R41.A7@89.1,122.75 89.101,122.224 C8_R41.1@89.175,122.15 ; R3_R41.1@89.599,126.881 89.904,126.88 v3(90,126.976)
  Inner2 w0.15: v4(89.122,126.146) 89.101,126.118 89.101,122.75 v3(89.17,122.681) 89.31,122.681 89.46,122.531 89.46,120.859 v2(89.525,120.794)
  Inner3 w0.15: v4(89.122,126.146) 89.129,126.805 89.3,126.976 v3(90,126.976) 90.104,127.08 91.392,127.08 v2(91.392,127.449)
  Bottom Layer w0.15: C21_R41.1@89.129,120.896 89.231,120.794 v2(89.525,120.794)
VDD_1V8_R42: C5_R42.1 C8_R42.1 C21_R42.1 R1_R42.1 R2_R42.1 R3_R42.1 U1_R42.A7 U1_R42.H7 U2_R42.A2 | length 11.2
  Top Layer w0.15: U1_R42.H7@108.1,125.55 108.094,126.118 v4(108.122,126.146) ; v3(108.17,122.681) U1_R42.A7@108.1,122.75 108.101,122.224 C8_R42.1@108.175,122.15 ; R3_R42.1@108.599,126.881 108.904,126.88 v3(109,126.976)
  Inner2 w0.15: v4(108.122,126.146) 108.101,126.118 108.101,122.75 v3(108.17,122.681) 108.31,122.681 108.46,122.531 108.46,120.859 v2(108.525,120.794)
  Inner3 w0.15: v4(108.122,126.146) 108.129,126.805 108.3,126.976 v3(109,126.976) 109.104,127.08 110.392,127.08 v2(110.392,127.449)
  Bottom Layer w0.15: C21_R42.1@108.129,120.896 108.231,120.794 v2(108.525,120.794)
VDD_1V8_R43: C5_R43.1 C8_R43.1 C21_R43.1 R1_R43.1 R2_R43.1 R3_R43.1 U1_R43.A7 U1_R43.H7 U2_R43.A2 | length 11.2
  Top Layer w0.15: U1_R43.H7@127.101,125.549 127.094,126.118 v4(127.122,126.146) ; v3(127.17,122.681) 127.101,122.75 127.101,122.224 C8_R43.1@127.175,122.15 ; R3_R43.1@127.599,126.881 127.904,126.88 v3(128,126.976)
  Inner2 w0.15: v4(127.122,126.146) 127.101,126.118 127.101,122.75 v3(127.17,122.681) 127.31,122.681 127.46,122.531 127.46,120.859 v2(127.525,120.794)
  Inner3 w0.15: v4(127.122,126.146) 127.129,126.805 127.3,126.976 v3(128,126.976) 128.104,127.08 129.392,127.08 v2(129.392,127.449)
  Bottom Layer w0.15: C21_R43.1@127.129,120.896 127.231,120.794 v2(127.525,120.794)
VDD_1V8_R44: C5_R44.1 C8_R44.1 C21_R44.1 R1_R44.1 R2_R44.1 R3_R44.1 U1_R44.A7 U1_R44.H7 U2_R44.A2 | length 11.2
  Top Layer w0.15: U1_R44.H7@146.1,125.55 146.094,126.118 v4(146.122,126.146) ; v3(146.17,122.681) U1_R44.A7@146.1,122.75 146.101,122.224 C8_R44.1@146.175,122.15 ; R3_R44.1@146.599,126.881 146.904,126.88 v3(147,126.976)
  Inner2 w0.15: v4(146.122,126.146) 146.101,126.118 146.101,122.75 v3(146.17,122.681) 146.31,122.681 146.46,122.531 146.46,120.859 v2(146.525,120.794)
  Inner3 w0.15: v4(146.122,126.146) 146.129,126.805 146.3,126.976 v3(147,126.976) 147.104,127.08 148.392,127.08 v2(148.392,127.449)
  Bottom Layer w0.15: C21_R44.1@146.129,120.896 146.231,120.794 v2(146.525,120.794)
VDD_1V8_R51: C5_R51.1 C8_R51.1 C21_R51.1 R1_R51.1 R2_R51.1 R3_R51.1 U1_R51.A7 U1_R51.H7 U2_R51.A2 | length 11.2
  Top Layer w0.15: U1_R51.H7@89.101,137.349 89.094,137.918 v4(89.122,137.946) ; v3(89.17,134.481) U1_R51.A7@89.1,134.55 89.101,134.024 C8_R51.1@89.175,133.95 ; R3_R51.1@89.599,138.68 89.904,138.68 v3(90,138.776)
  Inner2 w0.15: v4(89.122,137.946) 89.101,137.918 89.101,134.55 v3(89.17,134.481) 89.31,134.481 89.46,134.331 89.46,132.659 v2(89.525,132.594)
  Inner3 w0.15: v4(89.122,137.946) 89.129,138.605 89.3,138.776 v3(90,138.776) 90.104,138.88 91.392,138.88 v2(91.392,139.249)
  Bottom Layer w0.15: C21_R51.1@89.129,132.696 89.231,132.594 v2(89.525,132.594)
VDD_1V8_R52: C5_R52.1 C8_R52.1 C21_R52.1 R1_R52.1 R2_R52.1 R3_R52.1 U1_R52.A7 U1_R52.H7 U2_R52.A2 | length 11.2
  Top Layer w0.15: U1_R52.H7@108.101,137.349 108.094,137.918 v4(108.122,137.946) ; v3(108.17,134.481) U1_R52.A7@108.1,134.55 108.101,134.024 C8_R52.1@108.175,133.95 ; R3_R52.1@108.599,138.68 108.904,138.68 v3(109,138.776)
  Inner2 w0.15: v4(108.122,137.946) 108.101,137.918 108.101,134.55 v3(108.17,134.481) 108.31,134.481 108.46,134.331 108.46,132.659 v2(108.525,132.594)
  Inner3 w0.15: v4(108.122,137.946) 108.129,138.605 108.3,138.776 v3(109,138.776) 109.104,138.88 110.392,138.88 v2(110.392,139.249)
  Bottom Layer w0.15: C21_R52.1@108.13,132.694 108.231,132.594 v2(108.525,132.594)
VDD_1V8_R53: C5_R53.1 C8_R53.1 C21_R53.1 R1_R53.1 R2_R53.1 R3_R53.1 U1_R53.A7 U1_R53.H7 U2_R53.A2 | length 11.2
  Top Layer w0.15: U1_R53.H7@127.101,137.349 127.094,137.918 v4(127.122,137.946) ; v3(127.17,134.481) 127.101,134.55 127.101,134.024 C8_R53.1@127.175,133.95 ; R3_R53.1@127.599,138.68 127.904,138.68 v3(128,138.776)
  Inner2 w0.15: v4(127.122,137.946) 127.101,137.918 127.101,134.55 v3(127.17,134.481) 127.31,134.481 127.46,134.331 127.46,132.659 v2(127.525,132.594)
  Inner3 w0.15: v4(127.122,137.946) 127.129,138.605 127.3,138.776 v3(128,138.776) 128.104,138.88 129.392,138.88 v2(129.392,139.249)
  Bottom Layer w0.15: C21_R53.1@127.13,132.694 127.231,132.594 v2(127.525,132.594)
VDD_1V8_R54: C5_R54.1 C8_R54.1 C21_R54.1 R1_R54.1 R2_R54.1 R3_R54.1 U1_R54.A7 U1_R54.H7 U2_R54.A2 | length 11.2
  Top Layer w0.15: U1_R54.H7@146.101,137.349 146.094,137.918 v4(146.122,137.946) ; v3(146.17,134.481) U1_R54.A7@146.1,134.55 146.101,134.024 C8_R54.1@146.175,133.95 ; R3_R54.1@146.599,138.68 146.904,138.68 v3(147,138.776)
  Inner2 w0.15: v4(146.122,137.946) 146.101,137.918 146.101,134.55 v3(146.17,134.481) 146.31,134.481 146.46,134.331 146.46,132.659 v2(146.525,132.594)
  Inner3 w0.15: v4(146.122,137.946) 146.129,138.605 146.3,138.776 v3(147,138.776) 147.104,138.88 148.392,138.88 v2(148.392,139.249)
  Bottom Layer w0.15: C21_R54.1@146.129,132.696 146.231,132.594 v2(146.525,132.594)
VDD_IMU_P11: C60_P11.1 C63_P11.1 U11_P11.5 U11_P11.8 U11_P11.12 U13_P11.A2 | length 7.9
  Top Layer w0.15: v4(83.73,89.02) U11_P11.5@83.78,88.65 ; v3(84.1,86.12) 84.147,86.167 84.148,86.41 U11_P11.8@84.149,86.926
  Inner2 w0.15: v4(83.73,89.02) 83.78,88.775 83.55,88.775 83.55,87.435 83.96,87.025 83.96,86.26 v3(84.1,86.12)
  Inner3 w0.15: v4(83.73,89.02) 83.78,88.15 85.4,88.15 85.4,87.85 v3(85.6,87.65)
  Bottom Layer w0.15: 83.942,89.026 U13_P11.A2@84.175,89.026
VDD_IMU_P12: C60_P12.1 C63_P12.1 U11_P12.5 U11_P12.8 U11_P12.12 U13_P12.A2 | length 7.9
  Top Layer w0.15: v4(102.73,89.02) U11_P12.5@102.78,88.65 ; v3(103.1,86.12) 103.147,86.167 C60_P12.1@103.146,86.41 U11_P12.8@103.149,86.926
  Inner2 w0.15: v4(102.73,89.02) 102.78,88.775 102.55,88.775 102.55,87.435 102.96,87.025 102.96,86.26 v3(103.1,86.12)
  Inner3 w0.15: v4(102.73,89.02) 102.78,88.15 104.4,88.15 104.4,87.85 v3(104.6,87.65)
  Bottom Layer w0.15: 102.942,89.026 U13_P12.A2@103.175,89.026
VDD_IMU_P13: C60_P13.1 C63_P13.1 U11_P13.5 U11_P13.8 U11_P13.12 U13_P13.A2 | length 7.9
  Top Layer w0.15: v4(121.73,89.02) U11_P13.5@121.78,88.65 ; v3(122.1,86.12) 122.147,86.167 122.148,86.41 U11_P13.8@122.149,86.926
  Inner2 w0.15: v4(121.73,89.02) 121.78,88.775 121.55,88.775 121.55,87.435 121.96,87.025 121.96,86.26 v3(122.1,86.12)
  Inner3 w0.15: v4(121.73,89.02) 121.78,88.15 123.4,88.15 123.4,87.85 v3(123.6,87.65)
  Bottom Layer w0.15: 121.942,89.026 U13_P13.A2@122.175,89.026
VDD_IMU_P14: C60_P14.1 C63_P14.1 U11_P14.5 U11_P14.8 U11_P14.12 U13_P14.A2 | length 7.9
  Top Layer w0.15: v4(140.73,89.02) U11_P14.5@140.78,88.65 ; v3(141.1,86.12) 141.147,86.167 141.148,86.41 U11_P14.8@141.149,86.926
  Inner2 w0.15: v4(140.73,89.02) 140.78,88.775 140.55,88.775 140.55,87.435 140.96,87.025 140.96,86.26 v3(141.1,86.12)
  Inner3 w0.15: v4(140.73,89.02) 140.78,88.15 142.4,88.15 142.4,87.85 v3(142.6,87.65)
  Bottom Layer w0.15: 140.942,89.026 U13_P14.A2@141.175,89.026
VDD_IMU_P21: C60_P21.1 C63_P21.1 U11_P21.5 U11_P21.8 U11_P21.12 U13_P21.A2 | length 7.9
  Top Layer w0.15: v4(83.73,100.82) U11_P21.5@83.78,100.45 ; v3(84.1,97.92) 84.147,97.967 84.148,98.21 U11_P21.8@84.15,98.725
  Inner2 w0.15: v4(83.73,100.82) 83.78,100.575 83.55,100.575 83.55,99.235 83.96,98.825 83.96,98.06 v3(84.1,97.92)
  Inner3 w0.15: v4(83.73,100.82) 83.78,99.95 85.4,99.95 85.4,99.65 v3(85.6,99.45)
  Bottom Layer w0.15: 83.942,100.826 U13_P21.A2@84.175,100.825
VDD_IMU_P22: C60_P22.1 C63_P22.1 U11_P22.5 U11_P22.8 U11_P22.12 U13_P22.A2 | length 7.9
  Top Layer w0.15: v4(102.73,100.82) U11_P22.5@102.78,100.45 ; v3(103.1,97.92) 103.147,97.967 C60_P22.1@103.146,98.21 U11_P22.8@103.15,98.725
  Inner2 w0.15: v4(102.73,100.82) 102.78,100.575 102.55,100.575 102.55,99.235 102.96,98.825 102.96,98.06 v3(103.1,97.92)
  Inner3 w0.15: v4(102.73,100.82) 102.78,99.95 104.4,99.95 104.4,99.65 v3(104.6,99.45)
  Bottom Layer w0.15: 102.942,100.826 U13_P22.A2@103.175,100.825
VDD_IMU_P23: C60_P23.1 C63_P23.1 U11_P23.5 U11_P23.8 U11_P23.12 U13_P23.A2 | length 7.9
  Top Layer w0.15: v4(121.73,100.82) U11_P23.5@121.78,100.45 ; v3(122.1,97.92) 122.147,97.967 122.148,98.21 U11_P23.8@122.149,98.726
  Inner2 w0.15: v4(121.73,100.82) 121.78,100.575 121.55,100.575 121.55,99.235 121.96,98.825 121.96,98.06 v3(122.1,97.92)
  Inner3 w0.15: v4(121.73,100.82) 121.78,99.95 123.4,99.95 123.4,99.65 v3(123.6,99.45)
  Bottom Layer w0.15: 121.942,100.826 U13_P23.A2@122.175,100.825
VDD_IMU_P24: C60_P24.1 C63_P24.1 U11_P24.5 U11_P24.8 U11_P24.12 U13_P24.A2 | length 7.9
  Top Layer w0.15: v4(140.73,100.82) U11_P24.5@140.78,100.45 ; v3(141.1,97.92) 141.147,97.967 141.148,98.21 U11_P24.8@141.15,98.725
  Inner2 w0.15: v4(140.73,100.82) 140.78,100.575 140.55,100.575 140.55,99.235 140.96,98.825 140.96,98.06 v3(141.1,97.92)
  Inner3 w0.15: v4(140.73,100.82) 140.78,99.95 142.4,99.95 142.4,99.65 v3(142.6,99.45)
  Bottom Layer w0.15: 140.942,100.826 U13_P24.A2@141.175,100.825
VDD_IMU_P31: C60_P31.1 C63_P31.1 U11_P31.5 U11_P31.8 U11_P31.12 U13_P31.A2 | length 7.9
  Top Layer w0.15: v4(83.73,112.62) U11_P31.5@83.78,112.25 ; v3(84.1,109.72) 84.147,109.767 84.148,110.01 U11_P31.8@84.15,110.525
  Inner2 w0.15: v4(83.73,112.62) 83.78,112.375 83.55,112.375 83.55,111.035 83.96,110.625 83.96,109.86 v3(84.1,109.72)
  Inner3 w0.15: v4(83.73,112.62) 83.78,111.75 85.4,111.75 85.4,111.45 v3(85.6,111.25)
  Bottom Layer w0.15: 83.942,112.626 U13_P31.A2@84.175,112.625
VDD_IMU_P32: C60_P32.1 C63_P32.1 U11_P32.5 U11_P32.8 U11_P32.12 U13_P32.A2 | length 7.9
  Top Layer w0.15: v4(102.73,112.62) U11_P32.5@102.78,112.25 ; v3(103.1,109.72) 103.147,109.767 C60_P32.1@103.146,110.01 U11_P32.8@103.15,110.525
  Inner2 w0.15: v4(102.73,112.62) 102.78,112.375 102.55,112.375 102.55,111.035 102.96,110.625 102.96,109.86 v3(103.1,109.72)
  Inner3 w0.15: v4(102.73,112.62) 102.78,111.75 104.4,111.75 104.4,111.45 v3(104.6,111.25)
  Bottom Layer w0.15: 102.942,112.626 U13_P32.A2@103.175,112.625
VDD_IMU_P33: C60_P33.1 C63_P33.1 U11_P33.5 U11_P33.8 U11_P33.12 U13_P33.A2 | length 7.9
  Top Layer w0.15: v4(121.73,112.62) U11_P33.5@121.78,112.25 ; v3(122.1,109.72) 122.147,109.767 122.148,110.01 U11_P33.8@122.149,110.526
  Inner2 w0.15: v4(121.73,112.62) 121.78,112.375 121.55,112.375 121.55,111.035 121.96,110.625 121.96,109.86 v3(122.1,109.72)
  Inner3 w0.15: v4(121.73,112.62) 121.78,111.75 123.4,111.75 123.4,111.45 v3(123.6,111.25)
  Bottom Layer w0.15: 121.942,112.626 U13_P33.A2@122.175,112.625
VDD_IMU_P34: C60_P34.1 C63_P34.1 U11_P34.5 U11_P34.8 U11_P34.12 U13_P34.A2 | length 7.9
  Top Layer w0.15: v4(140.73,112.62) U11_P34.5@140.78,112.25 ; v3(141.1,109.72) 141.147,109.767 141.148,110.01 U11_P34.8@141.15,110.525
  Inner2 w0.15: v4(140.73,112.62) 140.78,112.375 140.55,112.375 140.55,111.035 140.96,110.625 140.96,109.86 v3(141.1,109.72)
  Inner3 w0.15: v4(140.73,112.62) 140.78,111.75 142.4,111.75 142.4,111.45 v3(142.6,111.25)
  Bottom Layer w0.15: 140.942,112.626 U13_P34.A2@141.175,112.625
VDD_IMU_P41: C60_P41.1 C63_P41.1 U11_P41.5 U11_P41.8 U11_P41.12 U13_P41.A2 | length 7.9
  Top Layer w0.15: v4(83.73,124.42) U11_P41.5@83.78,124.05 ; v3(84.1,121.52) 84.147,121.567 84.148,121.81 U11_P41.8@84.149,122.326
  Inner2 w0.15: v4(83.73,124.42) 83.78,124.175 83.55,124.175 83.55,122.835 83.96,122.425 83.96,121.66 v3(84.1,121.52)
  Inner3 w0.15: v4(83.73,124.42) 83.78,123.55 85.4,123.55 85.4,123.25 v3(85.6,123.05)
  Bottom Layer w0.15: 83.942,124.426 U13_P41.A2@84.175,124.426
VDD_IMU_P42: C60_P42.1 C63_P42.1 U11_P42.5 U11_P42.8 U11_P42.12 U13_P42.A2 | length 7.9
  Top Layer w0.15: v4(102.73,124.42) U11_P42.5@102.78,124.05 ; v3(103.1,121.52) 103.147,121.567 C60_P42.1@103.146,121.81 U11_P42.8@103.149,122.326
  Inner2 w0.15: v4(102.73,124.42) 102.78,124.175 102.55,124.175 102.55,122.835 102.96,122.425 102.96,121.66 v3(103.1,121.52)
  Inner3 w0.15: v4(102.73,124.42) 102.78,123.55 104.4,123.55 104.4,123.25 v3(104.6,123.05)
  Bottom Layer w0.15: 102.942,124.426 U13_P42.A2@103.175,124.426
VDD_IMU_P43: C60_P43.1 C63_P43.1 U11_P43.5 U11_P43.8 U11_P43.12 U13_P43.A2 | length 7.9
  Top Layer w0.15: v4(121.73,124.42) U11_P43.5@121.78,124.05 ; v3(122.1,121.52) 122.147,121.567 122.148,121.81 U11_P43.8@122.149,122.326
  Inner2 w0.15: v4(121.73,124.42) 121.78,124.175 121.55,124.175 121.55,122.835 121.96,122.425 121.96,121.66 v3(122.1,121.52)
  Inner3 w0.15: v4(121.73,124.42) 121.78,123.55 123.4,123.55 123.4,123.25 v3(123.6,123.05)
  Bottom Layer w0.15: 121.942,124.426 U13_P43.A2@122.175,124.426
VDD_IMU_P44: C60_P44.1 C63_P44.1 U11_P44.5 U11_P44.8 U11_P44.12 U13_P44.A2 | length 7.9
  Top Layer w0.15: v4(140.73,124.42) U11_P44.5@140.78,124.05 ; v3(141.1,121.52) 141.147,121.567 141.148,121.81 U11_P44.8@141.149,122.326
  Inner2 w0.15: v4(140.73,124.42) 140.78,124.175 140.55,124.175 140.55,122.835 140.96,122.425 140.96,121.66 v3(141.1,121.52)
  Inner3 w0.15: v4(140.73,124.42) 140.78,123.55 142.4,123.55 142.4,123.25 v3(142.6,123.05)
  Bottom Layer w0.15: 140.942,124.426 U13_P44.A2@141.175,124.426
VDD_IMU_P51: C60_P51.1 C63_P51.1 U11_P51.5 U11_P51.8 U11_P51.12 U13_P51.A2 | length 7.9
  Top Layer w0.15: v4(83.73,136.22) U11_P51.5@83.78,135.85 ; v3(84.1,133.32) 84.147,133.367 84.148,133.61 U11_P51.8@84.15,134.125
  Inner2 w0.15: v4(83.73,136.22) 83.78,135.975 83.55,135.975 83.55,134.635 83.96,134.225 83.96,133.46 v3(84.1,133.32)
  Inner3 w0.15: v4(83.73,136.22) 83.78,135.35 85.4,135.35 85.4,135.05 v3(85.6,134.85)
  Bottom Layer w0.15: 83.942,136.226 U13_P51.A2@84.175,136.225
VDD_IMU_P52: C60_P52.1 C63_P52.1 U11_P52.5 U11_P52.8 U11_P52.12 U13_P52.A2 | length 7.9
  Top Layer w0.15: v4(102.73,136.22) U11_P52.5@102.78,135.85 ; v3(103.1,133.32) 103.147,133.367 C60_P52.1@103.146,133.61 U11_P52.8@103.15,134.125
  Inner2 w0.15: v4(102.73,136.22) 102.78,135.975 102.55,135.975 102.55,134.635 102.96,134.225 102.96,133.46 v3(103.1,133.32)
  Inner3 w0.15: v4(102.73,136.22) 102.78,135.35 104.4,135.35 104.4,135.05 v3(104.6,134.85)
  Bottom Layer w0.15: 102.942,136.226 U13_P52.A2@103.175,136.225
VDD_IMU_P53: C60_P53.1 C63_P53.1 U11_P53.5 U11_P53.8 U11_P53.12 U13_P53.A2 | length 7.9
  Top Layer w0.15: v4(121.73,136.22) U11_P53.5@121.78,135.85 ; v3(122.1,133.32) 122.147,133.367 122.148,133.61 U11_P53.8@122.149,134.126
  Inner2 w0.15: v4(121.73,136.22) 121.78,135.975 121.55,135.975 121.55,134.635 121.96,134.225 121.96,133.46 v3(122.1,133.32)
  Inner3 w0.15: v4(121.73,136.22) 121.78,135.35 123.4,135.35 123.4,135.05 v3(123.6,134.85)
  Bottom Layer w0.15: 121.942,136.226 U13_P53.A2@122.175,136.225
VDD_IMU_P54: C60_P54.1 C63_P54.1 U11_P54.5 U11_P54.8 U11_P54.12 U13_P54.A2 | length 7.9
  Top Layer w0.15: v4(140.73,136.22) U11_P54.5@140.78,135.85 ; v3(141.1,133.32) 141.147,133.367 141.148,133.61 U11_P54.8@141.15,134.125
  Inner2 w0.15: v4(140.73,136.22) 140.78,135.975 140.55,135.975 140.55,134.635 140.96,134.225 140.96,133.46 v3(141.1,133.32)
  Inner3 w0.15: v4(140.73,136.22) 140.78,135.35 142.4,135.35 142.4,135.05 v3(142.6,134.85)
  Bottom Layer w0.15: 140.942,136.226 U13_P54.A2@141.175,136.225
VIN_P11: C50_P11.1 D10_P11.1 pad.JP3@86.274,88.099 U10_P11.A1 | length 3.8
  Inner2 w0.15: v2(85.051,88.52) 85.051,89.249 85,89.3 85,89.5 85.05,89.55 v3(85.051,90.036)
  Bottom Layer w0.15: U10_P11.A1@85.051,88.099 v2(85.051,88.52) ; D10_P11.1@85.051,88.65 v2(85.051,88.52) ; pad.JP3@86.275,88.099 86.275,88.52 v2(85.051,88.52)
VIN_P12: C50_P12.1 D10_P12.1 pad.JP3@105.276,88.099 U10_P12.A1 | length 3.8
  Inner2 w0.15: 104.05,89.55 104,89.5 104,89.3 104.051,89.249 v2(104.051,88.52) ; 104.051,89.55 v3(104.051,90.036)
  Bottom Layer w0.15: U10_P12.A1@104.05,88.1 v2(104.051,88.52) ; D10_P12.1@104.05,88.65 v2(104.051,88.52) ; pad.JP3@105.276,88.099 105.275,88.52 v2(104.051,88.52)
VIN_P13: C50_P13.1 D10_P13.1 pad.JP3@124.275,88.099 U10_P13.A1 | length 3.8
  Inner2 w0.15: 123.05,89.55 123,89.5 123,89.3 123.051,89.249 v2(123.051,88.52) ; 123.051,89.55 v3(123.051,90.036)
  Bottom Layer w0.15: U10_P13.A1@123.05,88.1 v2(123.051,88.52) ; D10_P13.1@123.05,88.65 v2(123.051,88.52) ; pad.JP3@124.275,88.099 124.275,88.52 v2(123.051,88.52)
VIN_P14: C50_P14.1 D10_P14.1 pad.JP3@143.274,88.099 U10_P14.A1 | length 3.8
  Inner2 w0.15: 142.05,89.55 142,89.5 142,89.3 142.051,89.249 v2(142.051,88.52) ; 142.051,89.55 v3(142.051,90.036)
  Bottom Layer w0.15: U10_P14.A1@142.051,88.099 v2(142.051,88.52) ; D10_P14.1@142.051,88.65 v2(142.051,88.52) ; pad.JP3@143.275,88.099 143.275,88.52 v2(142.051,88.52)
VIN_P21: C50_P21.1 D10_P21.1 pad.JP3@86.274,99.9 U10_P21.A1 | length 3.8
  Inner2 w0.15: v2(85.051,100.32) 85.051,101.049 85,101.1 85,101.3 85.05,101.35 v3(85.051,101.836)
  Bottom Layer w0.15: U10_P21.A1@85.051,99.899 v2(85.051,100.32) ; D10_P21.1@85.051,100.45 v2(85.051,100.32) ; pad.JP3@86.275,99.899 86.275,100.32 v2(85.051,100.32)
VIN_P22: C50_P22.1 D10_P22.1 pad.JP3@105.276,99.9 U10_P22.A1 | length 3.8
  Inner2 w0.15: 104.05,101.35 104,101.3 104,101.1 104.051,101.049 v2(104.051,100.32) ; 104.051,101.35 v3(104.051,101.836)
  Bottom Layer w0.15: U10_P22.A1@104.051,99.899 v2(104.051,100.32) ; D10_P22.1@104.05,100.45 v2(104.051,100.32) ; pad.JP3@105.275,99.899 105.275,100.32 v2(104.051,100.32)
VIN_P23: C50_P23.1 D10_P23.1 pad.JP3@124.275,99.9 U10_P23.A1 | length 3.8
  Inner2 w0.15: 123.05,101.35 123,101.3 123,101.1 123.051,101.049 v2(123.051,100.32) ; 123.051,101.35 v3(123.051,101.836)
  Bottom Layer w0.15: U10_P23.A1@123.051,99.899 v2(123.051,100.32) ; D10_P23.1@123.05,100.45 v2(123.051,100.32) ; pad.JP3@124.275,99.899 124.275,100.32 v2(123.051,100.32)
VIN_P24: C50_P24.1 D10_P24.1 pad.JP3@143.274,99.9 U10_P24.A1 | length 3.8
  Inner2 w0.15: 142.05,101.35 142,101.3 142,101.1 142.051,101.049 v2(142.051,100.32) ; 142.051,101.35 v3(142.051,101.836)
  Bottom Layer w0.15: U10_P24.A1@142.051,99.899 v2(142.051,100.32) ; D10_P24.1@142.051,100.45 v2(142.051,100.32) ; pad.JP3@143.275,99.899 143.275,100.32 v2(142.051,100.32)
VIN_P31: C50_P31.1 D10_P31.1 pad.JP3@86.274,111.698 U10_P31.A1 | length 3.8
  Inner2 w0.15: v2(85.051,112.12) 85.051,112.849 85,112.9 85,113.1 85.05,113.15 v3(85.051,113.636)
  Bottom Layer w0.15: U10_P31.A1@85.051,111.699 v2(85.051,112.12) ; D10_P31.1@85.051,112.25 v2(85.051,112.12) ; pad.JP3@86.275,111.699 86.275,112.12 v2(85.051,112.12)
VIN_P32: C50_P32.1 D10_P32.1 pad.JP3@105.276,111.698 U10_P32.A1 | length 3.8
  Inner2 w0.15: 104.05,113.15 104,113.1 104,112.9 104.051,112.849 v2(104.051,112.12) ; 104.051,113.15 v3(104.051,113.636)
  Bottom Layer w0.15: U10_P32.A1@104.05,111.7 v2(104.051,112.12) ; D10_P32.1@104.05,112.25 v2(104.051,112.12) ; pad.JP3@105.276,111.698 105.275,112.12 v2(104.051,112.12)
VIN_P33: C50_P33.1 D10_P33.1 pad.JP3@124.275,111.698 U10_P33.A1 | length 3.8
  Inner2 w0.15: 123.05,113.15 123,113.1 123,112.9 123.051,112.849 v2(123.051,112.12) ; 123.051,113.15 v3(123.051,113.636)
  Bottom Layer w0.15: U10_P33.A1@123.05,111.7 v2(123.051,112.12) ; D10_P33.1@123.05,112.25 v2(123.051,112.12) ; pad.JP3@124.275,111.698 124.275,112.12 v2(123.051,112.12)
VIN_P34: C50_P34.1 D10_P34.1 pad.JP3@143.274,111.698 U10_P34.A1 | length 3.8
  Inner2 w0.15: 142.05,113.15 142,113.1 142,112.9 142.051,112.849 v2(142.051,112.12) ; 142.051,113.15 v3(142.051,113.636)
  Bottom Layer w0.15: U10_P34.A1@142.051,111.699 v2(142.051,112.12) ; D10_P34.1@142.051,112.25 v2(142.051,112.12) ; pad.JP3@143.275,111.699 143.275,112.12 v2(142.051,112.12)
VIN_P41: C50_P41.1 D10_P41.1 pad.JP3@86.274,123.499 U10_P41.A1 | length 3.8
  Inner2 w0.15: v2(85.051,123.92) 85.051,124.649 85,124.7 85,124.9 85.05,124.95 v3(85.051,125.436)
  Bottom Layer w0.15: U10_P41.A1@85.051,123.499 v2(85.051,123.92) ; D10_P41.1@85.051,124.05 v2(85.051,123.92) ; pad.JP3@86.275,123.499 86.275,123.92 v2(85.051,123.92)
VIN_P42: C50_P42.1 D10_P42.1 pad.JP3@105.276,123.499 U10_P42.A1 | length 3.8
  Inner2 w0.15: 104.05,124.95 104,124.9 104,124.7 104.051,124.649 v2(104.051,123.92) ; 104.051,124.95 v3(104.051,125.436)
  Bottom Layer w0.15: U10_P42.A1@104.05,123.5 v2(104.051,123.92) ; D10_P42.1@104.05,124.05 v2(104.051,123.92) ; pad.JP3@105.276,123.499 105.275,123.92 v2(104.051,123.92)
VIN_P43: C50_P43.1 D10_P43.1 pad.JP3@124.275,123.499 U10_P43.A1 | length 3.8
  Inner2 w0.15: 123.05,124.95 123,124.9 123,124.7 123.051,124.649 v2(123.051,123.92) ; 123.051,124.95 v3(123.051,125.436)
  Bottom Layer w0.15: U10_P43.A1@123.05,123.5 v2(123.051,123.92) ; D10_P43.1@123.05,124.05 v2(123.051,123.92) ; pad.JP3@124.275,123.499 124.275,123.92 v2(123.051,123.92)
VIN_P44: C50_P44.1 D10_P44.1 pad.JP3@143.274,123.499 U10_P44.A1 | length 3.8
  Inner2 w0.15: 142.05,124.95 142,124.9 142,124.7 142.051,124.649 v2(142.051,123.92) ; 142.051,124.95 v3(142.051,125.436)
  Bottom Layer w0.15: U10_P44.A1@142.051,123.499 v2(142.051,123.92) ; D10_P44.1@142.051,124.05 v2(142.051,123.92) ; pad.JP3@143.275,123.499 143.275,123.92 v2(142.051,123.92)
VIN_P51: C50_P51.1 D10_P51.1 pad.JP3@86.274,135.3 U10_P51.A1 | length 3.8
  Inner2 w0.15: v2(85.051,135.72) 85.051,136.449 85,136.5 85,136.7 85.05,136.75 v3(85.051,137.236)
  Bottom Layer w0.15: U10_P51.A1@85.051,135.299 v2(85.051,135.72) ; D10_P51.1@85.051,135.85 v2(85.051,135.72) ; pad.JP3@86.275,135.299 86.275,135.72 v2(85.051,135.72)
VIN_P52: C50_P52.1 D10_P52.1 pad.JP3@105.276,135.3 U10_P52.A1 | length 3.8
  Inner2 w0.15: 104.05,136.75 104,136.7 104,136.5 104.051,136.449 v2(104.051,135.72) ; 104.051,136.75 v3(104.051,137.236)
  Bottom Layer w0.15: U10_P52.A1@104.051,135.299 v2(104.051,135.72) ; D10_P52.1@104.05,135.85 v2(104.051,135.72) ; pad.JP3@105.275,135.299 105.275,135.72 v2(104.051,135.72)
VIN_P53: C50_P53.1 D10_P53.1 pad.JP3@124.275,135.3 U10_P53.A1 | length 3.8
  Inner2 w0.15: 123.05,136.75 123,136.7 123,136.5 123.051,136.449 v2(123.051,135.72) ; 123.051,136.75 v3(123.051,137.236)
  Bottom Layer w0.15: U10_P53.A1@123.051,135.299 v2(123.051,135.72) ; D10_P53.1@123.05,135.85 v2(123.051,135.72) ; pad.JP3@124.275,135.299 124.275,135.72 v2(123.051,135.72)
VIN_P54: C50_P54.1 D10_P54.1 pad.JP3@143.274,135.3 U10_P54.A1 | length 3.8
  Inner2 w0.15: 142.05,136.75 142,136.7 142,136.5 142.051,136.449 v2(142.051,135.72) ; 142.051,136.75 v3(142.051,137.236)
  Bottom Layer w0.15: U10_P54.A1@142.051,135.299 v2(142.051,135.72) ; D10_P54.1@142.051,135.85 v2(142.051,135.72) ; pad.JP3@143.275,135.299 143.275,135.72 v2(142.051,135.72)
VINLS_P11: C56_P11.1 U10_P11.D4 U10_P11.E4 | length 1.2
  Bottom Layer w0.15: U10_P11.D4@83.85,86.9 U10_P11.E4@83.85,86.5 83.85,86.32 83.97,86.2 C56_P11.1@84.449,86.2
VINLS_P12: C56_P12.1 U10_P12.D4 U10_P12.E4 | length 1.2
  Bottom Layer w0.15: U10_P12.D4@102.85,86.9 U10_P12.E4@102.85,86.5 102.85,86.32 102.97,86.2 C56_P12.1@103.449,86.2
VINLS_P13: C56_P13.1 U10_P13.D4 U10_P13.E4 | length 1.2
  Bottom Layer w0.15: U10_P13.D4@121.85,86.9 U10_P13.E4@121.85,86.5 121.85,86.32 121.97,86.2 C56_P13.1@122.449,86.2
VINLS_P14: C56_P14.1 U10_P14.D4 U10_P14.E4 | length 1.2
  Bottom Layer w0.15: U10_P14.D4@140.85,86.9 U10_P14.E4@140.85,86.5 140.85,86.32 140.97,86.2 C56_P14.1@141.449,86.2
VINLS_P21: C56_P21.1 U10_P21.D4 U10_P21.E4 | length 1.2
  Bottom Layer w0.15: U10_P21.D4@83.85,98.7 83.85,98.299 83.85,98.12 83.97,98 C56_P21.1@84.449,98
VINLS_P22: C56_P22.1 U10_P22.D4 U10_P22.E4 | length 1.2
  Bottom Layer w0.15: U10_P22.D4@102.85,98.7 102.85,98.299 102.85,98.12 102.97,98 C56_P22.1@103.449,98
VINLS_P23: C56_P23.1 U10_P23.D4 U10_P23.E4 | length 1.2
  Bottom Layer w0.15: U10_P23.D4@121.85,98.7 121.85,98.299 121.85,98.12 121.97,98 C56_P23.1@122.449,98
VINLS_P24: C56_P24.1 U10_P24.D4 U10_P24.E4 | length 1.2
  Bottom Layer w0.15: U10_P24.D4@140.85,98.7 140.85,98.299 140.85,98.12 140.97,98 C56_P24.1@141.449,98
VINLS_P31: C56_P31.1 U10_P31.D4 U10_P31.E4 | length 1.2
  Bottom Layer w0.15: U10_P31.D4@83.85,110.5 U10_P31.E4@83.85,110.1 83.85,109.92 83.97,109.8 C56_P31.1@84.449,109.8
VINLS_P32: C56_P32.1 U10_P32.D4 U10_P32.E4 | length 1.2
  Bottom Layer w0.15: U10_P32.D4@102.85,110.5 U10_P32.E4@102.85,110.1 102.85,109.92 102.97,109.8 C56_P32.1@103.449,109.8
VINLS_P33: C56_P33.1 U10_P33.D4 U10_P33.E4 | length 1.2
  Bottom Layer w0.15: U10_P33.D4@121.85,110.5 U10_P33.E4@121.85,110.1 121.85,109.92 121.97,109.8 C56_P33.1@122.449,109.8
VINLS_P34: C56_P34.1 U10_P34.D4 U10_P34.E4 | length 1.2
  Bottom Layer w0.15: U10_P34.D4@140.85,110.5 U10_P34.E4@140.85,110.1 140.85,109.92 140.97,109.8 C56_P34.1@141.449,109.8
VINLS_P41: C56_P41.1 U10_P41.D4 U10_P41.E4 | length 1.2
  Bottom Layer w0.15: U10_P41.D4@83.85,122.3 U10_P41.E4@83.85,121.9 83.85,121.72 83.97,121.6 C56_P41.1@84.449,121.6